# Altium PCB PCB1.PcbDoc
Units mm, origin at the board's own origin, x right, y up, seen from the top; angles counter-clockwise.
Board outline 46.5 x 15.5 mm, 2 copper layers (Top Layer, Bottom Layer); 45 components, 10 nets, 92 pads, 38 vias.
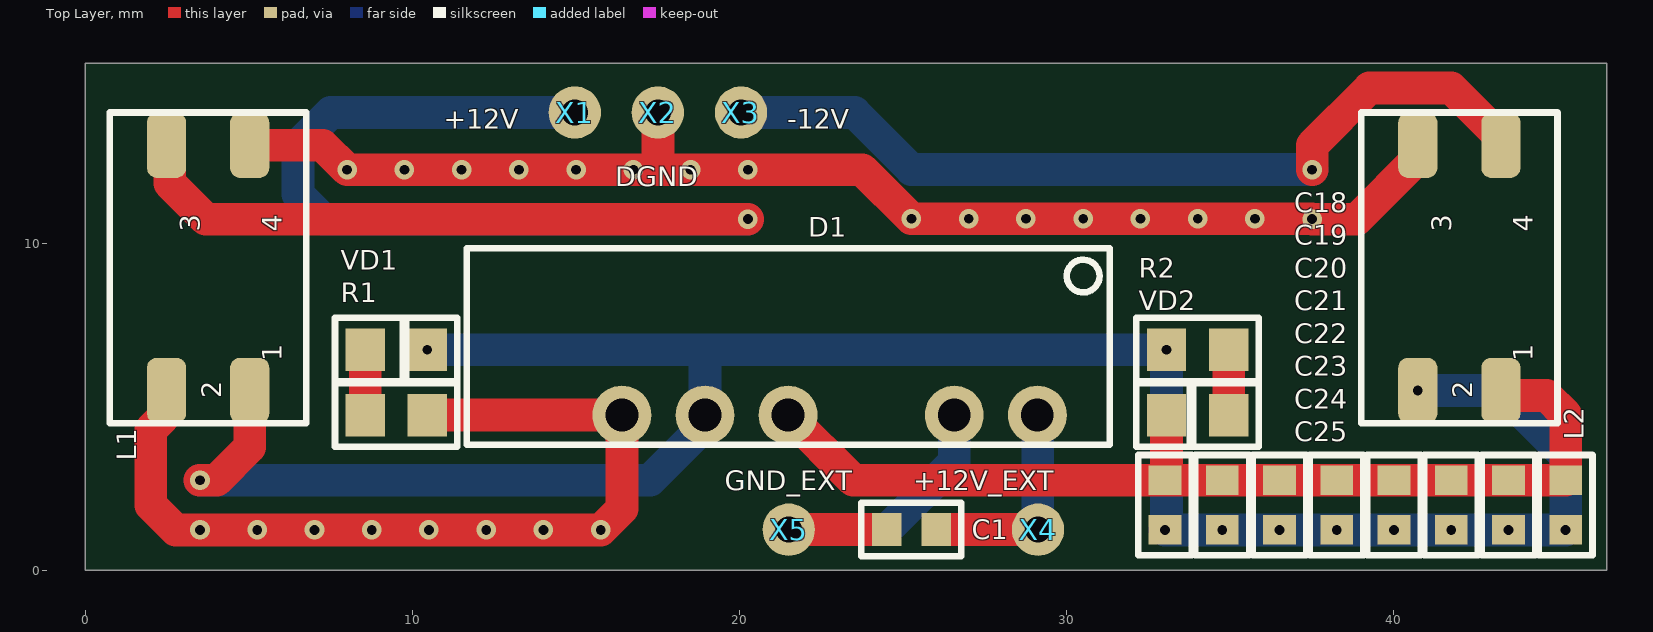
[diagram p0: Top Layer view]
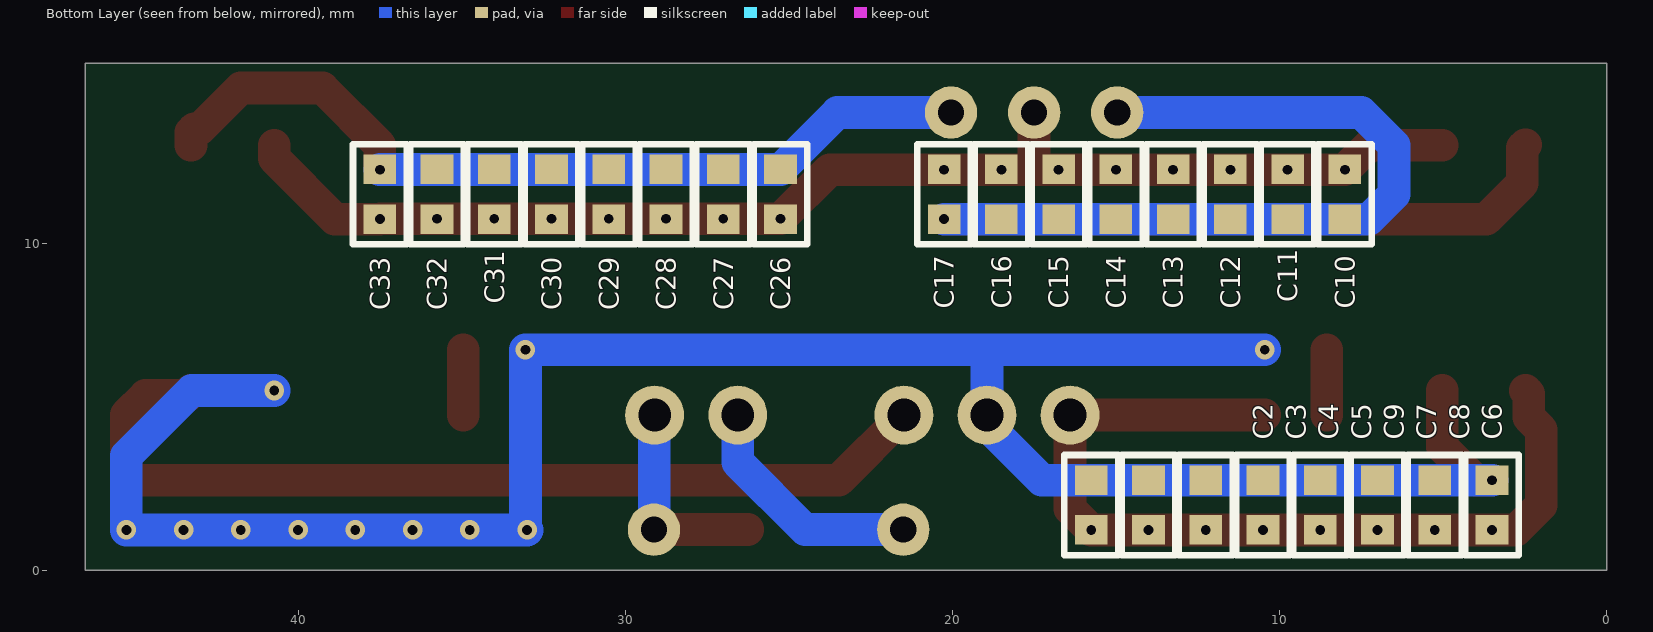
[diagram p1: Bottom Layer view, seen from below]

## Layer stack, top to bottom
Top Solder: solder mask 0.0102, Solder Resist, Dk 3.5
Top Layer: signal copper 0.0356
Dielectric 1: dielectric 0.32, FR-4, Dk 4.8
Bottom Layer: signal copper 0.0356
Bottom Solder: solder mask 0.0102, Solder Resist, Dk 3.5

## Board outline
0,0 46.5,0 46.5,15.5 0,15.5

## Design rules (kind name [scope] priority, off if disabled: settings)
Clearance [All] p1: gap=0.2 ignorepadtopadclearanceinfootprint=FALSE except(0: Arc-Hole Track-Hole SMDPad-Hole THPad-Hole Via-Hole Fill-Hole Poly-Hole Region-Hole Text-Hole)
ComponentClearance [All] p1: gap=0 collisioncheckmode=3 verticalgap=0 showdistances=FALSE
PolygonConnect [All] p1: thpad.connectstyle=Relief thpad.reliefconductorwidth=0.254 thpad.reliefentries=4 thpad.polygonreliefangle="90 Angle" thpad.airgapwidth=0.254 smdpad.connectstyle=Relief smdpad.reliefconductorwidth=0.254 smdpad.reliefentries=4 smdpad.polygonreliefangle="90 Angle" smdpad.airgapwidth=0.254 via.connectstyle=Direct via.reliefconductorwidth=0.254 via.reliefentries=4 via.polygonreliefangle="90 Angle" via.airgapwidth=0.254
RoutingVias [All] p1: holewidth=0.3 width=0.6 viastyle="Through Hole" minholewidth=0.3 minwidth=0.6 maxholewidth=1.2 maxwidth=2.4
SilkToSilkClearance [All] p1: silktosilkclearance=0
SilkToSolderMaskClearance [IsPad] p1: minsilkscreentomaskgap=0 clearancetoexposedcopper=TRUE
SolderMaskExpansion [All] p1: expansion=0.102 istentingtop=FALSE
Width [All] p1: maxlimit=1 minlimit=0.3 preferedwidth=0.3
27 further rules are at their usual default settings.

## Components (designator, comment, footprint, x,y, rotation, side; value= is the part's Value field where it differs from the comment)
C1 "2.2uF" 0603 25.25,1.25 r180 top
C2 "10uF 0603 25V" 0603 15.751,2 r90 bottom value=10uF
C3 "10uF 0603 25V" 0603 14.001,2 r90 bottom value=10uF
C4 "10uF 0603 25V" 0603 12.251,2 r90 bottom value=10uF
C5 "10uF 0603 25V" 0603 10.501,2 r90 bottom value=10uF
C6 "10uF 0603 25V" 0603 3.501,2 r90 bottom value=10uF
C7 "0.1uF 0603 25V" 0603 7.001,2 r90 bottom value=0.1uF
C8 "0.01uF 0603 25V" 0603 5.251,2 r90 bottom value=0.01uF
C9 "100pF 0603 25V" 0603 8.751,2 r90 bottom value=100pF
C10 "10uF 0603 25V" 0603 8,11.5 r90 bottom value=100pF
C11 "10uF 0603 25V" 0603 9.75,11.5 r90 bottom value=0.01uF
C12 "10uF 0603 25V" 0603 11.5,11.5 r90 bottom value=0.1uF
C13 "10uF 0603 25V" 0603 13.25,11.5 r90 bottom value=10uF
C14 "10uF 0603 25V" 0603 15,11.5 r90 bottom value=10uF
C15 "0.1uF 0603 25V" 0603 16.75,11.5 r90 bottom value=10uF
C16 "0.01uF 0603 25V" 0603 18.5,11.5 r90 bottom value=10uF
C17 "100pF 0603 25V" 0603 20.25,11.5 r90 bottom value=10uF
C18 "10uF 0603 25V" 0603 32.999,2 r90 top value=10uF
C19 "10uF 0603 25V" 0603 34.749,2 r90 top value=10uF
C20 "10uF 0603 25V" 0603 36.499,2 r90 top value=10uF
C21 "10uF 0603 25V" 0603 38.249,2 r90 top value=10uF
C22 "10uF 0603 25V" 0603 39.999,2 r90 top value=10uF
C23 "0.1uF 0603 25V" 0603 41.749,2 r90 top value=0.1uF
C24 "0.01uF 0603 25V" 0603 43.499,2 r90 top value=0.01uF
C25 "100pF 0603 25V" 0603 45.249,2 r90 top value=100pF
C26 "10uF 0603 25V" 0603 25.25,11.5 r90 bottom value=100pF
C27 "10uF 0603 25V" 0603 27,11.5 r90 bottom value=0.01uF
C28 "10uF 0603 25V" 0603 28.75,11.5 r90 bottom value=0.1uF
C29 "10uF 0603 25V" 0603 30.5,11.5 r90 bottom value=10uF
C30 "10uF 0603 25V" 0603 32.25,11.5 r90 bottom value=10uF
C31 "0.1uF 0603 25V" 0603 34,11.5 r90 bottom value=10uF
C32 "0.01uF 0603 25V" 0603 35.75,11.5 r90 bottom value=10uF
C33 "100pF 0603 25V" 0603 37.5,11.5 r90 bottom value=10uF
D1 "A1212S-1WR3" "A_S-1WR3 & B_LS-1WR3" 22.75,4.75 r180 top
L1 "SRF0905 2mH" SRF0905 3.75,9.25 r90 top
L2 "SRF0905 2mH" SRF0905 42,9.25 r90 top
R1 "12k" 0805 9.5,4.75 r0 top
R2 "12k" 0805 34,6.75 r180 top
VD1 "LED(0805)" 0805(LED) 9.5,6.75 r0 top
VD2 "LED(0805)" 0805(LED) 34,4.75 r180 top
X1 "VIA PBS" VIA#1 14.96,14.75 r0 top
X2 "VIA PBS" VIA#1 17.5,14.75 r0 top
X3 "VIA PBS" VIA#1 20.04,14.75 r0 top
X4 "VIA PBS" VIA#2 29.12,1.25 r0 top
X5 "VIA PBS" VIA#2 21.5,1.25 r0 top

## Footprints (in the part's own frame and the unit in brackets; to place one, negate y for a bottom-side part, rotate by r counter-clockwise, add the part's x,y. Pads: shape width x height; smd on the part's side, far side on the other; paste and mask are expansions set on the pad)
0603 [mm]
  rect 0.9x1 smd: 1(-0.76,0) 2(0.76,0)
  silkscreen extent -1.53,-0.82 1.53,0.82, body extent -0.8,-0.4 0.8,0.4, height 0.45
0805 [mm]
  rect 1.2x1.3 smd: 1(-0.95,0) 2(0.95,0)
  silkscreen extent -1.87,-0.97 1.87,0.97, body extent -1.05,-0.63 0.95,0.63, height 0.55
0805(LED) [mm]
  rect 1.2x1.3 smd: 1(-0.95,0) 2(0.95,0)
  silkscreen extent -1.87,-0.97 1.87,0.97
"A_S-1WR3 & B_LS-1WR3" [mm]
  round 1.8 hole 1: 1(-6.35,0) 2(-3.81,0) 4(1.27,0) 5(3.81,0) 6(6.35,0)
  silkscreen extent -8.56,-5.1 11.09,0.9, body extent -8.57,-5 11.07,1, height 10.16
SRF0905 [mm]
  rrect50% 2x1.2 smd: 1(-3.75,-1.27) 2(-3.75,1.27) 3(3.75,1.27) 4(3.75,-1.27)
  silkscreen extent -4.75,-3 4.75,3, body extent -4.6,-3 4.6,3, height 5
VIA#1 [mm]
  round 1.6 hole 0.8: 1(0,-0.75)
VIA#2 [mm]
  round 1.6 hole 0.8: 1(0,0)

## Part data
C1 C2 C3 C4 C5 C6 C7 C8 C9 C10 C11 C12 C13 C14 C15 C16 C17 C18 C19 C20 C21 C22 C23 C24 C25 C26 C27 C28 C29 C30 C31 C32 C33: library part C0603, ComponentHeigt=1.3, Firme=AVX, KIND=Конденсатор, Leadform=SMD, Packaging=0805
D1: library part "A_S-1WR3 & B_LS-1WR3"
L1 L2: library part SRF0905
R1 R2: library part "R0805 Yageo", ComponentHeigt=0.6, Firme=Yageo, KIND=Резистор, Leadform=SMD, Packaging=0805
X1 X2 X3 X4 X5: library part VIA
VD1 VD2: ComponentHeigt=0.75, Firme=Kingbright, KIND="Светодиод L-1154GD Kingbright", Leadform="в отверстия", NN=24003000

## Via types
v1: diameter 0.6, hole 0.3, Top Layer to Bottom Layer, tented both sides, 38 vias

## Nets (pads, with @x,y where several pads share a name; then routed paths per layer and width w, separated by ;. In a path a pad name is that pad's centre, name@x,y a point inside that pad or via, vN(x,y) a via of type N, cw(c..) or ccw(c..) an arc to the next point about the centre after c; other vN are vias at no path point)
+12V: C10.1 C11.1 C12.1 C13.1 C14.1 C15.1 C16.1 C17.1 L1.3 X1.1 | length 43.8
  Top Layer w1: L1.3@2.48,13.018 2.58,12.918 2.58,11.836 3.676,10.74 v1(20.25,10.74)
  Bottom Layer w1: X1.1 7.5,14 6.5,13 6.5,11.5 7.26,10.74 C10.1 C11.1 C12.1 C13.1 C14.1 C15.1 C16.1 v1(20.25,10.74)
+12V_DIRTY: C2.1 C3.1 C4.1 C5.1 C6.1 C7.1 C8.1 C9.1 D1.6 L1.2 R1.2 | length 27.5
  Top Layer w1: L1.2 2.38,5.4 2.38,4.683 2,4.303 2,2 2.76,1.24 v1(5.251,1.24) v1(7.001,1.24) v1(8.751,1.24) v1(10.501,1.24) v1(12.251,1.24) v1(14.001,1.24) v1(15.751,1.24) 16.4,1.889 D1.6 R1.2
  other v1: 3.501,1.24
+12V_EXT: C1.1 D1.1 X4.1 | length 6.4
  Top Layer w1: C1.1@26.25,1.25 X4.1
  Bottom Layer w1: D1.1 29.11,4.74 29.11,1.26 X4.1
-12V: C26.2 C27.2 C28.2 C29.2 C30.2 C31.2 C32.2 C33.2 L2.4 X3.1 | length 26.4
  Top Layer w1: v1(37.5,12.25) 37.5,13 39.25,14.75 41.75,14.75 43,13.5 43.17,13.5 43.27,13.4 L2.4
  Bottom Layer w1: X3.1 23.51,14 C26.2 37.49,12.26 v1(37.5,12.25)
-12V_DIRTY: C18.2 C19.2 C20.2 C21.2 C22.2 C23.2 C24.2 C25.2 D1.4 L2.1 VD2.2 | length 30.9
  Top Layer w1: D1.4 23.47,2.76 C18.2 ; VD2.2 33.05,2.811 C18.2 ; L2.1 43.27,5.448 43.37,5.348 44.664,5.348 45.249,4.762 C25.2 C18.2
DGND: C10.2 C11.2 C12.2 C13.2 C14.2 C15.2 C16.2 C17.2 C26.1 C27.1 C28.1 C29.1 C30.1 C31.1 C32.1 C33.1 L1.4 L2.3 X2.1 | length 39.6
  Top Layer w1: L1.4 7.25,13 v1(8,12.25) v1(9.75,12.25) v1(11.5,12.25) v1(13.25,12.25) v1(15,12.25) v1(16.75,12.25) 17.5,12.25 ; X2.1 17.5,12.25 ; L2.3 40.73,12.6 38.87,10.74 v1(37.5,10.74) 37.49,10.75 v1(35.75,10.75) v1(34,10.75) v1(32.25,10.75) v1(30.5,10.75) v1(28.75,10.75) v1(27,10.75) v1(25.25,10.75) 23.75,12.25 v1(20.25,12.25) v1(18.5,12.25) 17.5,12.25
DGND_DIRTY: C2.2 C3.2 C4.2 C5.2 C6.2 C7.2 C8.2 C9.2 C18.1 C19.1 C20.1 C21.1 C22.1 C23.1 C24.1 C25.1 D1.5 L1.1 L2.2 R2.2 VD1.2 | length 70.1
  Top Layer w1: v1(3.501,2.76) 4.01,2.76 5,3.75 5.02,3.77 L1.1
  Bottom Layer w1: v1(3.501,2.76) C8.2 C5.2 C4.2 C3.2 17.26,2.76 18.787,4.287 18.787,4.597 D1.5 18.94,6.75 ; v1(10.45,6.75) 18.94,6.75 ; v1(40.73,5.5) 43.25,5.5 45.249,3.501 v1(45.249,1.24) v1(43.499,1.24) v1(41.749,1.24) v1(39.999,1.24) v1(38.249,1.24) v1(36.499,1.24) v1(34.749,1.24) v1(32.999,1.24) 33.05,1.291 v1(33.05,6.75) 30.5,6.75 18.94,6.75
GND_EXT: C1.2 D1.2 X5.1 | length 10.1
  Top Layer w1: X5.1 C1.2@24.25,1.25
  Bottom Layer w1: X5.1 24.5,1.25 26.56,3.31 D1.2
NetR1_1: R1.1 VD1.1 | length 2
  Top Layer w1: R1.1 VD1.1
NetR2_1: R2.1 VD2.1 | length 2
  Top Layer w1: VD2.1 R2.1

## Silkscreen, mask and mechanical layers (free items; w line width, h text height)
Top Overlay:
  lines w0.3: 9.75,5.816 9.75,7.659 ; 33.816,3.87 33.816,5.688
  text "+12V" at 10.95,13.5 h0.6
  text "-12V" at 21.45,13.5 h0.6
  text "DGND" at 16.2,11.75 h0.6
  text "GND_EXT" at 19.551,2.45 h0.6
  text "+12V_EXT" at 25.301,2.45 h0.6

## Dimensions
46.5,15.5 to 46.5,0 on Mechanical 2
46.5,0 to 0,0 on Mechanical 2

## Text inside footprints (layer, text, board x,y; h text height)
L1: Top Overlay "2" at 4.15,5.267 h0.6 r90; Top Overlay "1" at 6,6.4 h0.6 r90; Top Overlay "3" at 3.5,10.35 h0.6 r90; Top Overlay "4" at 6,10.35 h0.6 r90
L2: Top Overlay "2" at 42.4,5.267 h0.6 r90; Top Overlay "1" at 44.25,6.4 h0.6 r90; Top Overlay "3" at 41.75,10.35 h0.6 r90; Top Overlay "4" at 44.25,10.35 h0.6 r90